# Altium PCB 0.PCB1.PcbDoc (part 8 of 12)
Units mm, origin at the board's own origin, x right, y up, seen from the top; angles counter-clockwise.
Board outline 77 x 72 mm, 6 copper layers (Top Layer, Layer 1, Layer 3, Layer 4, Layer 2, Bottom Layer), stack 1.538 mm thick; 570 components, 490 nets, 3331 pads, 1909 vias.
Unrouted connection lines stored in the file: 2.
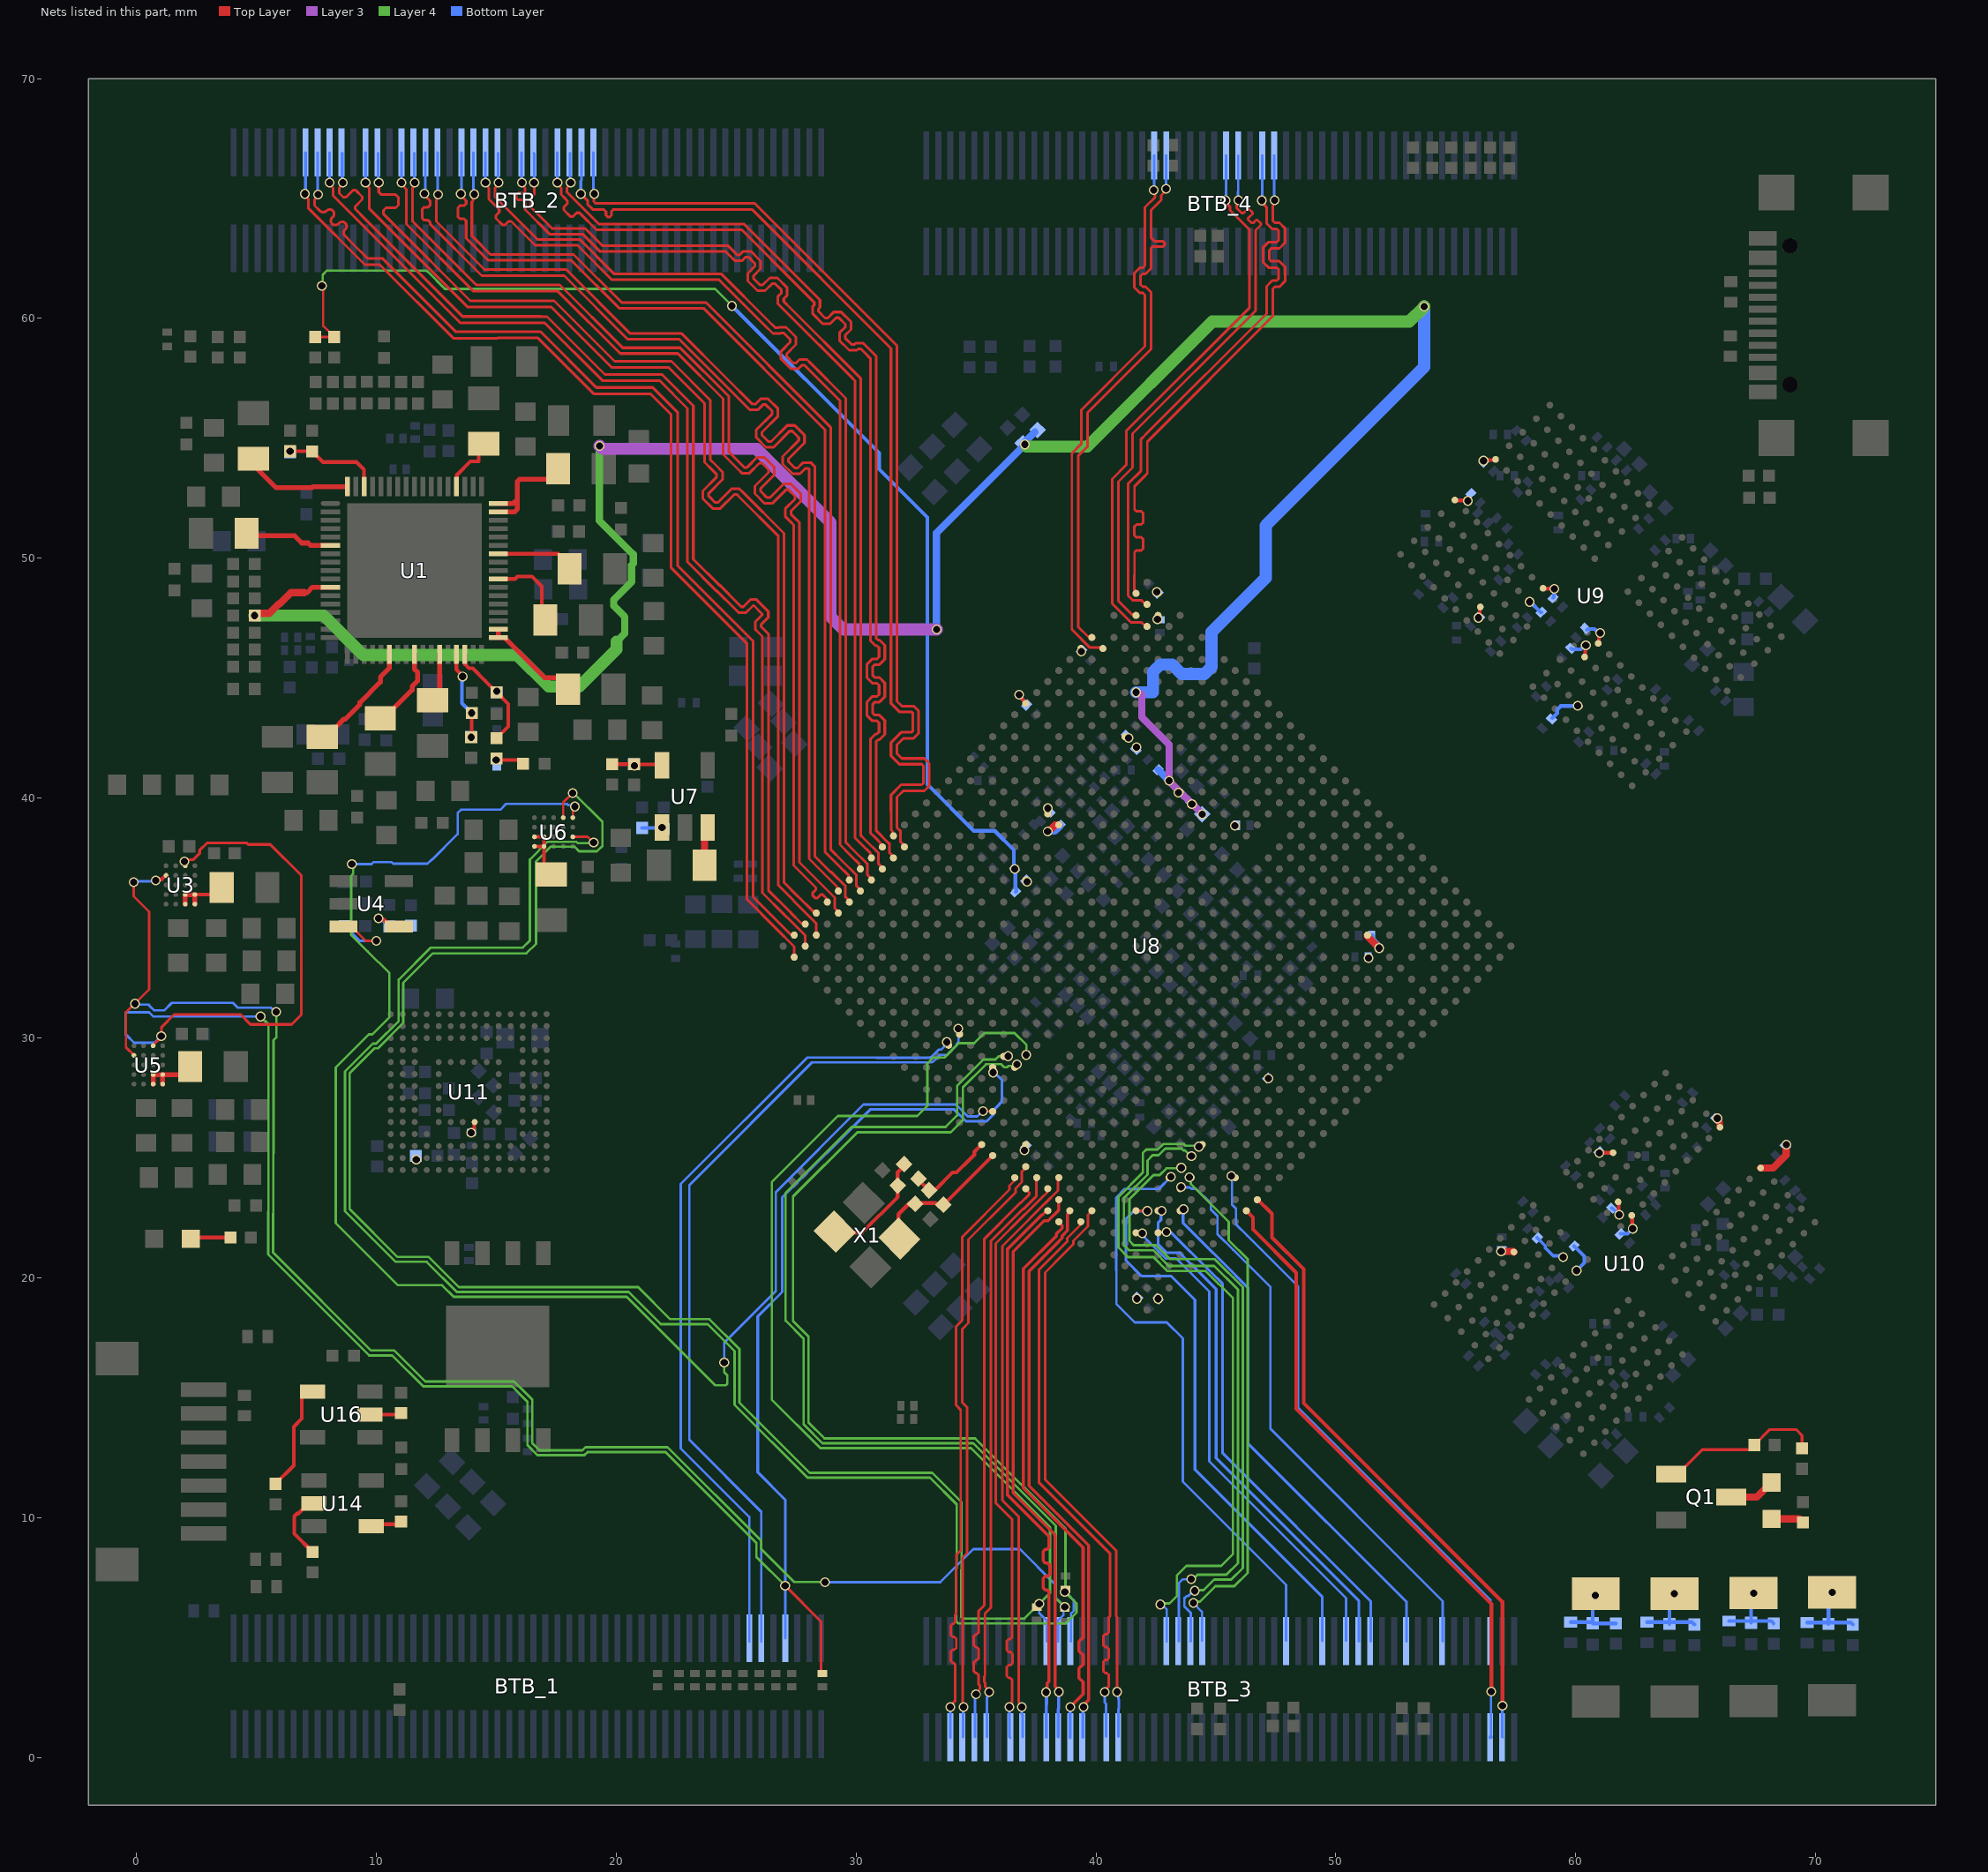
[diagram p12: the nets of this part, all layers, seen from the top]

## Via types
v1: diameter 0.41, hole 0.3, Top Layer to Bottom Layer, tented both sides, 1901 vias
v2: diameter 0.41, hole 0.3, Top Layer to Bottom Layer, 8 vias

## Nets (pads, with @x,y where several pads share a name; then routed paths per layer and width w, separated by ;. In a path a pad name is that pad's centre, name@x,y a point inside that pad or via, vN(x,y) a via of type N, cw(c..) or ccw(c..) an arc to the next point about the centre after c; other vN are vias at no path point) (continued)
HDMI_TX1_D2N: BTB_4.21 U8.AP6 | length 23.4
  Top Layer w0.109: U8.AP6@39.833,46.695 39.796,46.732 39.664,46.732 39.259,47.137 39.259,54.265 39.646,54.652 39.646,56.067 42.307,58.728 42.307,60.844 42.307,61.083 42.073,61.317 41.946,61.317 41.864,61.398 41.864,61.777 41.946,61.858 42.073,61.858 42.307,62.092 42.307,62.947 ; 42.313,62.952 42.364,63.003 42.803,63.003 42.861,63.06 42.861,63.151 42.803,63.208 42.453,63.208 42.307,63.354 42.307,64.523 42.722,64.939 42.722,65.126 42.924,65.327 v1(42.924,65.409)
  Bottom Layer w0.109: v1(42.924,65.409) 42.927,65.413 42.927,65.876 42.931,65.88 BTB_4.21@42.931,66.793
HDMI_TX1_D2P: BTB_4.20 U8.AN6 | length 23.4
  Top Layer w0.109: U8.AN6@40.292,46.235 40.256,46.271 39.755,46.271 38.997,47.029 38.997,54.373 39.385,54.76 39.385,56.175 42.046,58.836 42.046,60.844 42.046,60.975 41.964,61.056 41.837,61.056 41.603,61.29 41.603,61.885 41.837,62.119 41.964,62.119 42.046,62.2 42.046,62.947 42.046,64.632 42.461,65.047 42.461,65.306 v1(42.415,65.352)
  Bottom Layer w0.109: v1(42.415,65.352) 42.431,65.367 BTB_4.20@42.431,66.793
HDMI_TX1_D3N: BTB_4.27 U8.AN3 | length 23.4
  Top Layer w0.109: U8.AN3@41.671,47.614 41.635,47.65 41.51,47.65 40.941,48.218 40.941,53.191 41.528,53.778 41.528,55.193 46.656,60.322 46.656,62.977 46.656,63.677 46.877,63.898 46.877,63.959 46.735,64.101 46.674,64.101 46.552,63.979 46.491,63.979 46.35,64.121 46.35,64.182 46.525,64.357 46.525,64.418 46.383,64.56 46.322,64.56 46.163,64.401 46.073,64.401 46.025,64.449 45.861,64.613 45.861,64.706 45.889,64.734 45.889,64.863 v1(45.946,64.92)
  Bottom Layer w0.109: BTB_4.27@45.931,66.793 45.931,65.299 45.921,65.29 45.921,64.946 v1(45.946,64.92)
HDMI_TX1_D3P: BTB_4.26 U8.AM3 | length 23.3
  Top Layer w0.109: U8.AM3@42.126,47.16 42.074,47.16 41.917,47.317 41.469,47.317 40.677,48.109 40.677,48.631 40.677,53.301 41.263,53.887 41.263,55.303 46.392,60.432 46.392,63.709 45.597,64.504 45.597,64.643 45.395,64.845 v1(45.395,64.916)
  Bottom Layer w0.109: v1@45.431,64.952 45.421,64.962 45.421,65.497 45.431,65.507 BTB_4.26@45.431,66.793
HDMI_TX1_HPD_M0: BTB_3.48 U8.C24 | length 23.9
  Bottom Layer w0.102: v1(45.643,24.246) 45.675,24.214 45.675,23.051 45.839,22.887 45.839,22.225 46.311,21.753 48.419,19.645 48.419,14.577 56.455,6.542 BTB_3.48@56.455,4.843
HDMI_TX1_SBDN: BTB_4.30 U8.AP2 | length 23.4
  Top Layer w0.109: U8.AP2@41.671,48.533 41.634,48.57 41.634,48.666 41.608,48.693 41.608,49.298 41.609,49.299 41.609,49.653 41.609,50.248 41.69,50.329 41.893,50.329 41.974,50.41 41.974,50.789 41.893,50.87 41.688,50.87 41.607,50.951 41.607,51.329 41.688,51.411 41.893,51.411 41.974,51.492 41.974,51.87 41.893,51.951 41.69,51.951 41.609,52.032 41.609,52.446 41.609,53.001 42.071,53.462 42.071,53.466 42.143,53.538 42.143,54.858 47.379,60.094 47.379,60.295 47.379,61.232 47.461,61.313 47.649,61.313 47.885,61.549 47.885,62.146 47.649,62.382 47.309,62.382 47.228,62.463 47.228,62.841 47.309,62.923 47.649,62.923 47.885,63.158 47.885,63.756 47.649,63.992 47.461,63.992 47.379,64.073 47.379,64.334 47.379,64.613 47.377,64.616 47.377,64.706 47.389,64.718 47.389,64.863 v1(47.446,64.92)
  Bottom Layer w0.109: BTB_4.30@47.431,66.793 47.431,65.62 47.431,64.936 v1(47.446,64.92)
HDMI_TX1_SBDP: BTB_4.29 U8.AN2 | length 23.4
  Top Layer w0.109: U8.AN2@42.13,48.074 42.079,48.074 41.915,48.237 41.548,48.237 41.347,48.439 41.347,49.298 41.345,49.299 41.345,53.11 41.881,53.646 41.881,54.966 42.058,55.142 42.058,55.146 47.115,60.204 47.115,60.295 47.115,61.341 47.351,61.577 47.539,61.577 47.62,61.658 47.62,62.037 47.539,62.118 47.199,62.118 46.964,62.354 46.964,62.951 47.199,63.187 47.539,63.187 47.62,63.268 47.62,63.646 47.539,63.728 47.351,63.728 47.115,63.963 47.115,64.334 47.115,64.503 47.112,64.506 47.112,64.639 46.915,64.836 v1(46.915,64.916)
  Bottom Layer w0.109: v1(46.915,64.916) 46.931,64.932 46.931,65.413 BTB_4.29@46.931,66.793
HDMI_TX1_SCL_M0: BTB_1.45 U8.AB30 | length 34.6
  Bottom Layer w0.102: BTB_1.45@26.051,4.843 26.051,10.238 23.05,13.239 23.05,23.864 28.163,28.977 30.73,28.977 33.146,28.977 33.163,28.994 33.202,28.994 33.5,29.293 33.797,29.293 34.194,29.69 34.194,29.746 34.274,29.826 34.274,30.366 v1(34.259,30.381)
HDMI_TX1_SDA_M0: BTB_1.44 U8.AB31 | length 33.8
  Bottom Layer w0.102: BTB_1.44@25.551,4.843 25.551,10.026 22.697,12.881 22.697,23.909 27.968,29.181 30.527,29.181 30.838,29.181 30.848,29.17 33.066,29.17 33.083,29.187 33.122,29.187 33.444,29.509 33.544,29.509 33.786,29.751 v1(33.786,29.823)
HDMI_VDDA0V85_S0: C33.2 C256.2 C257.2 C260.2 C265.2 C266.2 C267.2 C270.2 U1.11 U8.AA9 U8.AB9 U8.AC9 U8.AD9 | length 108.9
  Top Layer w0.203: 6.993,48.563 7.117,48.563 7.343,48.789 U1.11@8.09,48.789
  Top Layer w0.305: v1(4.928,47.609) 5.026,47.707 5.543,47.707 5.935,48.099 5.975,48.099 6.439,48.563 6.993,48.563
  Layer 3 w0.305: v1(37.041,54.746) v1@37.061,54.726 ; v1(41.673,44.41) 41.69,44.41 41.777,44.323 41.909,44.323 41.909,43.372 43.05,42.232 v1(43.05,40.72) 43.05,40.712 44.427,39.335 v1(44.427,39.328)
  Layer 3 w0.508: v1(19.303,54.687) 19.43,54.56 25.864,54.56 28.93,51.494 28.93,47.575 29.471,47.034 v1(33.356,47.034)
  Layer 4 w0.305: v1(19.303,54.687) 19.298,54.682 19.298,51.574 20.711,50.161 20.711,49.781 20.644,49.715 20.644,49.02 19.896,48.271 19.896,48.019 20.23,47.684 ; 20.018,46.522 20.355,46.858 20.355,47.559 20.23,47.684
  Layer 4 w0.508: v1(4.928,47.609) 7.382,47.609 7.384,47.607 7.805,47.607 7.807,47.609 9.456,45.959 15.874,45.959 17.185,44.648 18.468,44.648 20.018,46.199 20.018,46.522 ; v1@37.101,54.654 39.641,54.654 44.851,59.863 53.062,59.863 53.682,60.482 v1(53.682,60.488)
  Bottom Layer w0.305: v1(33.356,47.034) 33.356,51.058 37.041,54.743 v1(37.041,54.746) ; v1(37.041,54.746) 37.04,54.844 C267.2@37.459,55.262 ; C266.2@42.59,41.18 v1(43.05,40.72)
  Bottom Layer w0.508: v1(41.673,44.41) 42.382,44.41 42.382,45.271 42.68,45.568 43.176,45.568 43.576,45.169 44.52,45.169 44.818,45.467 44.818,46.919 47.078,49.18 47.078,51.364 53.682,57.968 v1(53.682,60.488)
  other v1: 44.002,39.753 43.443,40.231
I2C0_SCL_M2: BTB_1.47 R44.2 U3.A3 U5.A3 U8.W30 | length 102.7
  Top Layer w0.114: U5.A3@0.699,29.671 0.699,29.695 1.034,30.029 v1(1.034,30.074) 1.049,30.09 1.049,30.451 1.577,30.978 4.335,30.978 4.754,30.559 6.472,30.559 6.875,30.962 6.875,36.771 5.581,38.065 4.664,38.065 4.605,38.123 2.94,38.123 2.636,37.819 2.636,37.691 2.381,37.436 2.157,37.436 2.075,37.355 v1(2.002,37.355) ; v1(27.045,7.161) 28.544,5.662 R44.2@28.544,3.452
  Top Layer w0.156: v1(2.002,37.355) 2.029,37.329 2.029,37.184 U3.A3@2.037,37.176
  Layer 4 w0.102: v1(5.176,30.889) 5.506,30.559 5.506,22.766 5.496,22.755 5.496,20.968 9.702,16.762 10.666,16.762 11.961,15.468 15.665,15.468 16.301,14.831 16.301,13.02 16.721,12.6 18.675,12.6 18.807,12.732 22.058,12.732 25.848,8.942 25.848,8.358 v1(27.045,7.161)
  Bottom Layer w0.102: v1(1.034,30.074) 1.034,30.073 0.762,29.801 -0.096,29.801 -0.434,30.139 -0.434,31.066 0.535,31.066 0.711,30.889 v1(5.176,30.889)
  Bottom Layer w0.114: v1(27.045,7.161) 27.051,7.155 BTB_1.47@27.051,4.97 ; v1@27.051,7.161 27.051,10.739 25.903,11.886 25.903,18.388 26.921,19.405 26.921,23.348 30.586,27.013 32.694,27.013 34.09,27.013 34.573,26.53 35.458,26.53 35.729,26.802 35.729,26.98 35.986,27.236 35.986,27.248 36.088,27.351 36.088,28.235 35.769,28.555 v1(35.71,28.555)
I2C0_SDA_M2: BTB_3.12 R43.2 U3.B1 U5.B1 U8.W29 | length 107.5
  Top Layer w0.102: v1(-0.112,36.493) -0.112,35.901 0.53,35.258 0.53,32.03 -0.434,31.066 -0.434,29.604 U5.B1@-0.101,29.271
  Top Layer w0.156: v1(0.806,36.56) 0.862,36.616 1.066,36.616 1.226,36.776 U3.B1@1.237,36.776
  Layer 4 w0.102: v1(5.834,31.082) 5.834,30.018 5.721,29.905 5.721,25.183 5.709,25.171 5.709,22.681 5.699,22.671 5.699,21.053 9.787,16.965 10.751,16.965 12.045,15.671 15.749,15.671 16.504,14.916 16.504,13.104 16.805,12.803 18.591,12.803 18.723,12.935 22.142,12.935 26.051,9.026 26.051,8.688 27.426,7.313 28.701,7.313 v1(28.709,7.305) ; v1(36.339,29.237) 35.955,29.237 35.813,29.095 35.314,29.095 34.212,27.993 34.212,26.763 33.733,26.284 33.423,26.284 29.809,26.284 27.063,23.539 27.063,18.21 27.816,17.457 27.816,13.883 28.599,13.099 34.881,13.099 38.327,9.653 38.327,6.648 v1(38.704,6.272)
  Bottom Layer w0.102: v1(-0.112,36.493) -0.079,36.526 0.772,36.526 v1(0.806,36.56) ; v1(-0.06,31.423) -0.06,31.387 0.501,31.387 0.592,31.296 0.736,31.152 1.169,31.152 1.478,31.461 4.025,31.461 4.228,31.258 5.61,31.258 5.785,31.082 v1(5.834,31.082) ; v1(28.709,7.305) 33.515,7.305 34.891,8.682 36.832,8.682 38.28,7.234 38.28,6.696 v1(38.704,6.272) 38.645,6.213 38.645,5.932 38.431,5.718 BTB_3.12@38.431,4.843
I2C1_SCL_M2: BTB_3.13 R41.2 U6.A3 U8.V29 | length 106.9
  Top Layer w0.102: U6.A3@18.193,38.384 18.809,38.384 19.049,38.144 v1(19.061,38.144)
  Layer 4 w0.102: v1(19.061,38.144) 19.041,38.123 18.394,38.123 18.338,38.179 17.144,38.179 16.4,37.435 16.4,34.054 16.111,33.765 12.273,33.765 10.934,32.426 10.934,30.7 9.993,29.76 9.854,29.76 8.698,28.603 8.698,22.77 10.806,20.662 12.1,20.662 13.359,19.403 20.524,19.403 21.86,18.067 23.809,18.067 24.937,16.94 24.937,14.703 27.98,11.66 33.087,11.66 34.198,10.548 34.198,7.902 34.181,7.884 34.181,5.663 34.258,5.586 38.734,5.586 39.186,6.038 39.186,6.425 v1@38.704,6.907 ; v1(36.703,28.892) 36.646,28.835 36.357,28.835 36.299,28.776 36.18,28.776 36.054,28.902 35.414,28.902 34.453,27.941 34.453,26.578 33.944,26.068 33.639,26.068 30.058,26.068 27.375,23.386 27.375,18.185 28.019,17.541 28.019,13.967 28.684,13.302 34.966,13.302 38.729,9.539 38.729,6.922 v1(38.704,6.897)
  Bottom Layer w0.102: v1(38.704,6.897) 38.739,6.897 39.081,6.555 39.081,6.115 38.961,5.995 38.961,4.848 BTB_3.13@38.955,4.843
I2C1_SDA_M2: BTB_3.11 R39.2 U6.B1 U8.V28 | length 110.2
  Top Layer w0.102: U6.B1@17.793,39.184 17.793,39.819 v1(18.181,40.206)
  Layer 4 w0.102: v1(18.181,40.206) 18.226,40.206 19.427,39.005 19.427,38.004 19.201,37.778 18.452,37.778 18.254,37.976 17.276,37.976 16.661,37.361 16.661,33.924 16.263,33.526 12.357,33.526 11.127,32.296 11.127,30.62 10.073,29.567 9.934,29.567 8.891,28.523 8.891,22.864 10.89,20.865 12.184,20.865 13.443,19.607 20.917,19.607 22.253,18.271 23.893,18.271 25.14,17.024 25.14,14.787 28.064,11.863 33.171,11.863 34.402,10.633 34.402,7.818 34.384,7.8 34.384,5.866 34.461,5.789 37.027,5.789 v1(37.637,6.399) 38.091,6.852 38.091,9.599 34.794,12.896 28.515,12.896 26.489,14.922 26.489,23.991 29.242,26.744 32.549,26.744 32.975,27.169 32.975,28.94 33.217,29.182 33.686,29.182 34.282,29.778 34.931,29.778 35.351,30.198 36.607,30.198 37.107,29.698 37.107,29.301 v1(37.097,29.29)
  Bottom Layer w0.102: v1(37.637,6.399) 37.637,6.011 37.955,5.693 BTB_3.11@37.955,4.843
I2C2_SCL_M4: BTB_3.53 U8.A25 | length 26.2
  Top Layer w0.156: U8.A25@46.267,22.795 46.544,22.517 46.544,22.016 48.353,20.207 48.353,14.535 56.484,6.404 v1(56.484,2.741)
  Bottom Layer w0.102: BTB_3.53@56.469,0.857 v1@56.469,2.727
  Bottom Layer w0.156: BTB_3.53@56.455,0.843 BTB_3.53@56.469,0.857 ; v1@56.469,2.727 v1(56.484,2.741)
I2C2_SDA_M4: BTB_3.52 U8.A24 | length 26.7
  Top Layer w0.156: U8.A24@46.727,23.255 46.755,23.255 47.284,22.726 47.342,22.667 47.342,21.679 48.661,20.361 48.661,14.768 56.946,6.482 v1(56.946,2.157)
  Bottom Layer w0.102: v1(56.946,2.157) 56.939,2.149 56.939,0.859 BTB_3.52@56.955,0.843
I2C5_SCL_M3: BTB_3.24 U8.E26 | length 22
  Layer 4 w0.102: v1(43.905,24.19) 43.953,24.142 43.953,23.908 45.536,22.324 45.536,21.562 46.324,20.775 46.324,7.694 45.765,7.135 44.978,7.135 44.34,6.498 44.117,6.498 v1(44.058,6.439)
  Bottom Layer w0.102: v1(44.058,6.439) 44.419,6.078 BTB_3.24@44.419,4.878
I2C5_SDA_M3: BTB_3.44 U8.E27 | length 23.8
  Bottom Layer w0.102: v1(43.543,23.781) 43.559,23.765 43.921,23.765 43.971,23.714 44.177,23.714 44.79,23.1 44.79,22.843 45.067,22.567 45.067,21.822 45.723,21.165 47.276,19.612 47.276,13.693 54.455,6.515 BTB_3.44@54.455,4.843
I2C7_SCL_M0: BTB_3.23 U8.F26 | length 26.5
  Layer 4 w0.102: v1(43.559,24.583) 43.538,24.562 42.938,24.562 42.656,24.28 42.399,24.28 41.396,23.277 41.396,21.537 41.574,21.359 42.501,21.359 43.085,20.775 44.952,20.775 46.121,19.607 46.121,7.897 45.638,7.415 44.927,7.415 44.485,6.972 44.15,6.972 v1(44.124,6.946)
  Bottom Layer w0.102: BTB_3.23@43.955,4.843 43.955,6.024 43.686,6.293 43.686,6.631 43.776,6.721 43.834,6.721 44.06,6.946 v1(44.124,6.946)
I2C7_SDA_M0: BTB_3.31 U8.F27 | length 24.8
  Bottom Layer w0.102: v1(43.133,24.211) 42.623,23.701 41.204,23.701 40.842,23.339 40.842,20.298 40.853,20.287 40.853,18.909 41.62,18.141 42.699,18.141 42.95,18.141 43.619,17.472 43.619,11.499 47.931,7.187 BTB_3.31@47.931,4.867
I2C8_SCL_M2: BTB_3.21 U8.F24 | length 29.3
  Layer 4 w0.102: v1(42.687,6.373) 42.738,6.425 43.073,6.425 43.377,6.729 43.377,7.592 43.771,7.986 45.219,7.986 45.714,8.481 45.714,19.149 44.586,20.277 42.986,20.277 42.4,20.863 41.333,20.863 40.939,21.258 40.939,23.366 41.955,24.382 41.955,25.195 42.107,25.347 42.577,25.347 42.804,25.574 43.655,25.574 43.723,25.506 44.259,25.506 v1(44.296,25.468)
  Bottom Layer w0.102: v1(42.687,6.373) 42.742,6.373 42.955,6.161 BTB_3.21@42.955,4.843
I2C8_SDA_M2: BTB_3.22 U8.F25 | length 28.3
  Layer 4 w0.102: v1(43.975,7.436) 44.059,7.436 44.241,7.618 45.435,7.618 45.917,8.1 45.917,19.505 44.927,20.496 43.041,20.496 42.391,21.146 41.381,21.146 41.168,21.359 41.168,23.321 42.148,24.302 42.148,24.889 42.363,25.104 42.607,25.104 42.884,25.381 43.575,25.381 43.643,25.313 43.715,25.313 43.952,25.076 v1(43.984,25.076)
  Bottom Layer w0.102: BTB_3.22@43.455,4.843 43.455,7.264 43.618,7.427 43.966,7.427 v1(43.975,7.436)
I2S0_LRCK: BTB_3.38 U8.D30 | length 20.7
  Bottom Layer w0.114: v1(42.942,21.902) 42.979,21.865 43.159,21.865 44.791,20.233 45.282,19.741 45.282,12.683 51.455,6.511 BTB_3.38@51.455,4.843
I2S0_MCLK: BTB_3.34 U8.F30 | length 23.2
  Top Layer w0.114: U8.F30@41.671,22.794 41.677,22.788 42.137,22.788 v1(42.144,22.781)
  Bottom Layer w0.114: v1(42.144,22.781) 41.584,22.781 41.251,22.449 41.251,20.717 41.907,20.061 43.142,20.061 43.881,19.323 44.129,19.074 44.129,12.004 49.431,6.703 BTB_3.34@49.431,4.867
I2S0_SCLK: BTB_3.36 U8.E31 | length 20.8
  Bottom Layer w0.102: v1(41.936,21.848) 41.936,21.773 42.909,20.8 43.352,20.8 44.724,19.429 44.724,12.342 50.431,6.635 BTB_3.36@50.431,4.867
I2S0_SDI0: BTB_3.41 U8.D28 | length 21.9
  Bottom Layer w0.114: v1(43.651,22.855) 43.633,22.837 43.633,22.286 44.567,21.352 44.57,21.352 45.24,20.682 46.342,19.581 46.342,13.089 52.955,6.475 BTB_3.41@52.955,4.843
I2S0_SDO0: BTB_3.37 U8.E29 | length 21.8
  Bottom Layer w0.114: v1(42.735,22.789) 42.714,22.767 42.714,22.41 42.588,22.284 42.588,21.403 42.947,21.044 43.49,21.044 44.546,19.988 45.011,19.523 45.011,12.479 50.955,6.535 BTB_3.37@50.955,4.843
MIPI_DPHY0_RX_CLKN: BTB_2.13 U8.AP31 | length 45.7
  Top Layer w0.112: v1(10.103,65.658) 10.103,65.636 10.103,65.266 10.212,65.158 10.813,65.158 10.922,65.049 10.922,64.722 10.813,64.614 10.41,64.614 10.301,64.505 10.301,64.351 10.638,64.013 13.922,60.73 17.411,60.73 19.931,58.21 22.306,58.21 23.929,56.587 23.929,54.104 24.162,53.871 24.433,53.6 24.433,53.283 23.855,52.706 23.855,52.59 24.125,52.321 24.24,52.321 24.817,52.898 25.134,52.898 25.296,52.737 26.994,51.039 26.994,36.482 27.576,35.899 27.588,35.899 28.2,35.288 28.207,35.288 28.29,35.204 U8.AP31@28.342,35.204
  Bottom Layer w0.112: v1@10.077,65.685 BTB_2.13@10.077,66.895
MIPI_DPHY0_RX_CLKP: BTB_2.12 U8.AN32 | length 45.7
  Top Layer w0.112: v1(9.552,65.658) 9.552,65.588 9.715,65.426 9.715,64.567 13.813,60.469 17.303,60.469 19.823,57.948 22.198,57.948 22.432,57.715 23.685,56.461 23.685,54.003 23.99,53.698 24.189,53.499 24.189,53.384 23.612,52.806 23.612,52.489 24.024,52.077 24.341,52.077 24.918,52.655 25.034,52.655 25.124,52.564 26.75,50.938 26.75,36.381 27.404,35.727 27.404,35.714 28.342,34.776 U8.AN32@28.342,34.285
  Bottom Layer w0.112: v1@9.551,65.659 BTB_2.12@9.551,66.92
MIPI_DPHY0_RX_D0N: BTB_2.17 U8.AP29 | length 45.8
  Top Layer w0.112: v1(12.01,65.2) 12.01,65.142 12.241,64.911 12.241,64.829 12.241,64.718 12.159,64.637 12,64.637 11.919,64.555 11.919,64.174 12,64.093 12.159,64.093 12.241,64.011 12.241,63.955 12.241,63.937 14.4,61.778 17.84,61.778 20.489,59.128 22.637,59.128 24.4,57.366 25.584,56.182 25.897,56.182 26.121,56.405 26.236,56.405 26.505,56.136 26.505,56.02 25.836,55.351 25.836,55.037 26.245,54.628 26.559,54.628 27.229,55.297 27.344,55.297 27.613,55.028 27.613,54.913 26.944,54.243 26.944,53.929 27.353,53.52 27.667,53.52 27.898,53.752 28.014,53.752 28.048,53.718 28.048,53.607 28.048,37.468 29.225,36.291 29.225,36.159 U8.AP29@29.261,36.123
  Bottom Layer w0.112: v1(12.01,65.2) 12.047,65.237 12.047,66.916 BTB_2.17@12.051,66.92
MIPI_DPHY0_RX_D0P: BTB_2.18 U8.AN29 | length 45.8
  Top Layer w0.112: v1(12.578,65.167) 12.521,65.11 12.521,64.971 12.502,64.953 12.502,64.045 14.508,62.039 17.917,62.039 20.589,59.368 22.736,59.368 24.569,57.535 25.683,56.421 25.798,56.421 26.022,56.644 26.335,56.644 26.745,56.235 26.745,55.921 26.075,55.252 26.075,55.136 26.344,54.867 26.46,54.867 27.129,55.537 27.443,55.537 27.853,55.127 27.853,54.814 27.183,54.144 27.183,54.029 27.452,53.759 27.568,53.759 27.799,53.991 28.113,53.991 28.272,53.832 28.287,53.817 28.287,37.567 28.946,36.908 28.975,36.908 29.559,36.325 29.559,35.877 29.721,35.715 U8.AN29@29.721,35.664
  Bottom Layer w0.112: v1@12.555,65.19 12.551,65.194 12.551,66.912 BTB_2.18@12.555,66.916
MIPI_DPHY0_RX_D1N: BTB_2.15 U8.AP30 | length 45.8
  Top Layer w0.112: v1(11.052,65.658) 11.052,65.588 11.255,65.385 11.255,63.933 14.057,61.131 17.575,61.131 20.172,58.534 22.57,58.534 24.456,56.647 24.456,54.334 25.082,53.709 25.241,53.549 25.555,53.549 25.967,53.961 26.082,53.961 26.351,53.692 26.351,53.576 25.782,53.007 25.782,52.693 26.191,52.284 26.505,52.284 27.074,52.853 27.19,52.853 27.459,52.584 27.459,52.469 27.047,52.057 27.047,51.743 27.283,51.508 27.398,51.393 27.398,37.189 28.318,36.269 28.318,36.176 28.185,36.042 28.185,35.949 28.298,35.837 28.391,35.837 28.524,35.97 28.617,35.97 28.765,35.822 28.765,35.7 U8.AP30@28.801,35.664
  Bottom Layer w0.112: v1@11.051,65.659 BTB_2.15@11.051,66.92
MIPI_DPHY0_RX_D1P: BTB_2.16 U8.AN30 | length 45.8
  Top Layer w0.112: v1(11.603,65.658) 11.546,65.601 11.546,65.473 11.517,65.443 11.517,64.041 14.165,61.392 17.652,61.392 20.271,58.773 22.669,58.773 24.696,56.746 24.696,54.433 25.251,53.878 25.34,53.789 25.456,53.789 25.867,54.2 26.181,54.2 26.591,53.791 26.591,53.477 26.021,52.908 26.021,52.792 26.29,52.523 26.405,52.523 26.975,53.093 27.289,53.093 27.698,52.683 27.698,52.369 27.287,51.958 27.287,51.842 27.452,51.677 27.637,51.492 27.637,37.32 29.11,35.846 29.11,35.407 29.174,35.343 ; 29.174,35.342 29.261,35.255 U8.AN30@29.261,35.204
  Bottom Layer w0.112: v1@11.577,65.685 BTB_2.16@11.577,66.895
MIPI_DPHY0_RX_D2N: BTB_2.10 U8.AP32 | length 45.8
  Top Layer w0.112: v1(8.603,65.658) 8.603,65.588 8.458,65.444 8.458,65.439 8.458,65.222 8.624,65.056 8.739,65.056 9.028,65.344 9.143,65.344 9.412,65.075 9.412,64.959 9.124,64.671 9.124,64.556 9.549,64.131 13.601,60.079 16.857,60.079 16.864,60.072 17.117,60.072 19.529,57.66 21.911,57.66 23.218,56.353 23.218,49.955 24.299,48.874 24.318,48.874 25.121,48.071 25.213,47.979 25.306,47.979 25.602,48.275 25.849,48.275 26.343,47.781 26.343,47.533 26.047,47.237 26.047,47.144 26.093,47.098 26.185,47.006 26.347,46.844 26.347,36.156 27.204,35.299 27.21,35.299 27.278,35.231 27.278,35.216 27.713,34.781 27.846,34.781 U8.AP32@27.882,34.745
  Bottom Layer w0.112: v1@8.577,65.685 BTB_2.10@8.577,66.895
MIPI_DPHY0_RX_D2P: BTB_2.9 U8.AN33 | length 45.8
  Top Layer w0.112: v1(8.052,65.658) 8.052,65.588 8.197,65.444 8.197,65.222 8.199,65.22 8.199,65.114 13.493,59.819 17.013,59.819 19.425,57.407 21.807,57.407 22.965,56.249 22.965,49.85 24.194,48.621 24.213,48.621 24.942,47.892 25.034,47.8 25.108,47.726 25.41,47.726 25.706,48.022 25.745,48.022 26.091,47.676 26.091,47.638 25.795,47.341 25.795,47.039 25.914,46.92 26.006,46.828 26.094,46.74 26.094,36.051 27.025,35.12 27.025,35.114 27.093,35.047 27.108,35.047 27.739,34.416 27.746,34.416 27.882,34.28 U8.AN33@27.882,33.825
  Bottom Layer w0.112: v1@8.051,65.659 BTB_2.9@8.051,66.92
MIPI_DPHY0_RX_D3N: BTB_2.8 U8.AP33 | length 45.8
  Top Layer w0.112: v1(7.577,65.167) 7.577,65.103 7.427,64.953 7.427,64.936 7.427,64.709 7.658,64.478 ccw(c7.788,64.607) 7.917,64.478 7.932,64.492 cw(c8.061,64.363) 8.191,64.492 cw(c8.061,64.363) 8.191,64.233 8.161,64.203 ccw(c8.29,64.074) 8.161,63.944 ccw(c8.29,64.074) 8.42,63.944 8.45,63.974 cw(c8.579,63.845) 8.709,63.974 cw(c8.579,63.845) 8.709,63.715 8.694,63.701 ccw(c8.824,63.571) 8.694,63.442 8.993,63.143 9.632,62.504 10.253,62.504 13.32,59.438 14.951,59.438 14.956,59.443 16.848,59.443 19.172,57.12 21.53,57.12 22.556,56.093 22.556,49.701 25.713,46.544 25.713,35.877 27.269,34.322 27.386,34.322 U8.AP33@27.423,34.285
  Bottom Layer w0.112: v1@7.555,65.19 BTB_2.8@7.555,66.916
MIPI_DPHY0_RX_D3P: BTB_2.7 U8.AN34 | length 45.8
  Top Layer w0.112: v1(7.027,65.195) 7.027,65.119 7.166,64.98 7.166,64.601 9.524,62.243 10.145,62.243 13.211,59.176 15.059,59.176 15.064,59.182 16.74,59.182 19.064,56.858 21.427,56.858 21.662,56.622 21.662,56.617 22.295,55.985 22.295,49.601 25.457,46.438 25.457,35.772 26.638,34.591 27.423,33.806 U8.AN34@27.423,33.366
  Bottom Layer w0.112: v1@7.051,65.219 BTB_2.7@7.051,66.92
MIPI_DPHY0_TX_CLKN: BTB_2.25 U8.AP26 | length 41.6
  Top Layer w0.112: v1@16.075,65.603 16.075,65.571 16.203,65.443 16.203,65.281 16.137,65.215 15.904,65.215 15.839,65.149 15.839,65.011 15.904,64.946 16.095,64.946 16.203,64.838 16.203,64.541 17.24,63.503 18.62,63.503 19.337,62.786 24.569,62.786 24.782,62.573 24.941,62.414 25.255,62.414 25.399,62.558 25.515,62.558 25.784,62.289 25.784,62.174 25.486,61.875 25.486,61.562 25.895,61.152 26.209,61.152 26.507,61.451 26.623,61.451 26.892,61.181 26.892,61.066 26.747,60.921 26.747,60.607 27.101,60.254 29.781,57.574 29.953,57.402 29.953,38.349 30.244,38.058 30.607,37.695 30.607,37.535 U8.AP26@30.64,37.502
  Bottom Layer w0.112: BTB_2.25@16.051,66.92 16.051,65.984 16.059,65.976 16.059,65.666 v1(16.067,65.658)
MIPI_DPHY0_TX_CLKP: BTB_2.26 U8.AN26 | length 41.6
  Top Layer w0.112: v1@16.552,65.603 16.579,65.577 16.579,65.17 16.449,65.041 16.449,64.633 17.339,63.743 18.719,63.743 19.436,63.025 24.668,63.025 24.951,62.742 25.04,62.653 25.156,62.653 25.3,62.798 25.614,62.798 26.023,62.388 26.023,62.074 25.725,61.776 25.725,61.661 25.994,61.392 26.11,61.392 26.408,61.69 26.722,61.69 27.131,61.28 27.131,60.967 26.987,60.822 26.987,60.707 27.27,60.423 30.02,57.673 30.192,57.501 30.192,38.448 30.343,38.297 30.937,37.703 30.937,37.256 31.099,37.093 U8.AN26@31.099,37.043
  Bottom Layer w0.112: BTB_2.26@16.567,66.885 16.579,66.873 v1(16.579,65.658)
MIPI_DPHY0_TX_D0N: BTB_2.30 U8.AP24 | length 41.7
  Top Layer w0.112: v1@18.564,65.202 18.564,65.158 18.805,64.916 18.805,64.762 19.024,64.544 19.476,64.544 19.575,64.444 19.575,64.298 19.641,64.232 19.738,64.232 19.804,64.298 19.804,64.46 19.887,64.544 25.659,64.544 31.458,58.745 31.458,43.945 31.806,43.597 32.308,43.597 32.374,43.531 32.374,42.804 32.308,42.738 31.884,42.738 31.458,42.312 31.458,41.76 31.806,41.413 32.743,41.413 32.808,41.347 32.808,41.014 32.802,41.008 32.802,40.614 32.743,40.554 31.884,40.554 31.458,40.127 31.458,39.411 31.469,39.4 31.469,38.669 31.523,38.614 31.523,38.456 U8.AP24@31.554,38.425 ; U8.AP24@31.525,38.456 U8.AP24@31.559,38.422
  Bottom Layer w0.112: v1@18.551,65.219 18.527,65.243 18.527,65.738 18.547,65.758 18.547,66.916 BTB_2.30@18.551,66.92
  other v1: 18.527,65.195
MIPI_DPHY0_TX_D0P: BTB_2.31 U8.AN24 | length 41.7
  Top Layer w0.112: v1(19.086,65.19) 19.067,65.171 19.067,64.871 19.132,64.805 25.767,64.805 31.708,58.864 31.708,44.033 31.905,43.836 32.407,43.836 32.613,43.63 32.613,42.705 32.395,42.487 31.971,42.487 31.708,42.224 31.708,41.849 31.905,41.652 32.842,41.652 33.048,41.446 33.048,41.014 33.054,41.008 33.054,40.509 32.847,40.303 31.971,40.303 31.708,40.039 31.708,38.768 31.857,38.619 31.857,38.175 32.019,38.013 U8.AN24@32.019,37.962
  Bottom Layer w0.112: BTB_2.31@19.055,66.916 19.051,66.912 19.051,65.549 19.049,65.547 19.055,65.541 19.055,65.222 v1(19.086,65.19)
MIPI_DPHY0_TX_D1N: BTB_2.28 U8.AP25 | length 41.7
  Top Layer w0.112: v1(17.552,65.658) 17.552,65.599 17.708,65.443 17.708,65.162 17.846,65.025 17.968,64.903 17.968,64.787 17.818,64.638 17.818,64.522 18.087,64.253 18.203,64.253 18.352,64.403 18.468,64.403 18.507,64.363 19.177,63.694 25.236,63.694 27.613,61.317 28.256,60.674 28.256,60.558 28.2,60.502 28.2,60.189 28.61,59.779 28.923,59.779 29.168,60.024 29.283,60.024 29.552,59.754 29.552,59.639 29.308,59.394 29.308,59.081 29.717,58.671 30.031,58.671 30.087,58.727 30.202,58.727 30.349,58.581 30.595,58.335 30.595,46.797 30.595,46.572 30.817,46.35 30.878,46.35 30.959,46.269 30.959,45.888 30.878,45.806 30.68,45.806 30.458,45.584 30.458,45.005 30.68,44.784 30.878,44.784 30.959,44.702 30.959,44.321 30.878,44.239 30.68,44.239 30.458,44.018 30.458,43.439 30.68,43.217 30.878,43.217 30.959,43.135 30.959,42.754 30.878,42.673 30.817,42.673 30.595,42.451 30.595,41.91 30.595,38.549 30.826,38.318 31.028,38.116 31.028,38.084 31.099,38.013 U8.AP25@31.099,37.962
  Bottom Layer w0.112: v1@17.551,65.659 BTB_2.28@17.551,66.92
MIPI_DPHY0_TX_D1P: BTB_2.29 U8.AN25 | length 41.6
  Top Layer w0.112: v1(18.103,65.658) 18.103,65.599 17.947,65.443 17.947,65.262 19.276,63.933 25.335,63.933 27.782,61.486 28.495,60.773 28.495,60.459 28.439,60.403 28.439,60.288 28.709,60.018 28.824,60.018 29.069,60.263 29.382,60.263 29.792,59.854 29.792,59.54 29.547,59.295 29.547,59.18 29.816,58.911 29.932,58.911 29.988,58.967 30.301,58.967 30.518,58.75 30.834,58.434 30.834,46.797 30.834,46.671 30.916,46.589 30.977,46.589 31.199,46.368 31.199,45.789 30.977,45.567 30.779,45.567 30.698,45.485 30.698,45.104 30.779,45.023 30.977,45.023 31.199,44.801 31.199,44.222 30.977,44 30.779,44 30.698,43.919 30.698,43.538 30.779,43.456 30.977,43.456 31.199,43.234 31.199,42.655 30.977,42.434 30.916,42.434 30.834,42.352 30.834,41.91 30.834,38.648 30.925,38.557 31.267,38.215 31.397,38.085 31.397,37.715 31.559,37.553 U8.AN25@31.559,37.502
  Bottom Layer w0.112: v1@18.077,65.685 BTB_2.29@18.077,66.895
MIPI_DPHY0_TX_D2N: BTB_2.22 U8.AP27 | length 41.7
  Top Layer w0.112: v1(14.552,65.658) 14.552,65.586 14.694,65.444 14.694,64.974 15.024,64.644 15.125,64.543 15.125,64.428 14.985,64.288 14.985,64.172 15.254,63.903 15.37,63.903 15.51,64.043 15.625,64.043 15.665,64.004 16.622,63.047 18.387,63.047 19.823,61.611 24.292,61.611 26.146,59.756 26.534,59.368 26.848,59.368 26.872,59.392 26.987,59.392 27.256,59.123 27.256,59.008 26.873,58.624 26.873,58.311 27.283,57.901 27.596,57.901 27.741,58.046 27.856,58.046 27.946,57.957 29.331,56.572 29.331,38.052 29.785,37.598 30.147,37.236 30.147,37.076 U8.AP27@30.18,37.043
  Bottom Layer w0.112: v1@14.552,65.66 BTB_2.22@14.552,65.976 ; BTB_2.22@14.551,65.977 BTB_2.22@14.551,66.92
MIPI_DPHY0_TX_D2P: BTB_2.23 U8.AN27 | length 41.7
  Top Layer w0.112: v1(15.098,65.658) 15.098,65.586 14.956,65.444 14.956,65.051 16.721,63.286 18.486,63.286 19.923,61.85 24.391,61.85 26.315,59.926 26.633,59.608 26.749,59.608 26.773,59.632 27.086,59.632 27.496,59.222 27.496,58.909 27.112,58.525 27.112,58.41 27.382,58.141 27.497,58.141 27.642,58.285 27.955,58.285 28.115,58.126 29.57,56.671 29.57,38.151 29.884,37.838 30.478,37.243 30.478,36.796 30.64,36.634 U8.AN27@30.64,36.583
  Bottom Layer w0.112: BTB_2.23@15.077,66.894 15.077,65.679 v1(15.098,65.658)
MIPI_DPHY0_TX_D3N: BTB_2.20 U8.AP28 | length 41.6
  Top Layer w0.112: v1(13.527,65.195) 13.527,65.126 13.746,64.907 13.746,64.779 13.664,64.698 13.484,64.698 13.403,64.616 13.403,64.235 13.484,64.154 13.664,64.154 13.746,64.072 13.746,64.016 13.746,63.344 14.662,62.428 18.125,62.428 20.126,60.427 23.639,60.427 28.703,55.363 28.703,37.761 29.255,37.209 29.688,36.776 29.688,36.616 U8.AP28@29.721,36.583
  Bottom Layer w0.112: v1@13.551,65.219 BTB_2.20@13.551,66.92
MIPI_DPHY0_TX_D3P: BTB_2.21 U8.AN28 | length 41.6
  Top Layer w0.112: v1(14.086,65.176) 14.029,65.119 14.029,64.892 13.985,64.848 13.985,63.443 14.761,62.667 18.224,62.667 20.225,60.666 23.738,60.666 28.943,55.462 28.943,37.86 29.424,37.378 30.018,36.784 30.018,36.336 30.18,36.174 U8.AN28@30.18,36.124
  Bottom Layer w0.112: BTB_2.21@14.055,66.916 14.055,65.207 v1(14.086,65.176)
NetC25_1: C25.1 R3.1 R5.2 U1.31 | length 3.8
  Top Layer w0.156: U1.31@13.34,45.988 13.34,45.354 13.597,45.097 v1(13.597,45.069) ; v1(13.955,42.536) 13.978,42.558 v1(13.978,43.545)
  Bottom Layer w0.156: v1(13.597,45.069) 13.622,45.044 13.622,44.917 13.573,44.868 13.573,43.95 v1(13.978,43.545)
NetC42_1: C42.1 R7.1 R9.2 U1.66 | length 4.1
  Top Layer w0.156: R7.1@6.409,54.46 6.41,54.459 R9.2@7.323,54.459 7.773,54.01 9.177,54.01 9.49,53.697 U1.66@9.49,52.989
  other v1: 6.409,54.46
NetC63_2: C63.2 R11.2 R12.2 U1.32 | length 4.6
  Top Layer w0.156: U1.32@13.69,45.988 13.712,45.967 13.712,45.562 13.866,45.409 14.019,45.409 14.562,44.866 14.969,44.459 v1(15.019,44.459) C63.2@15.019,44.409 15.502,43.926 15.502,42.986 R12.2@15.019,42.504
NetC70_1: C70.1 R12.1 U2.1 | length 1.2
  Top Layer w0.156: v1(14.994,41.589) 15.966,41.589 C70.1@16.119,41.437
NetC80_2: C80.2 R21.2 U4.4 | length 2.5
  Top Layer w0.156: v1(10.09,34.985) 10.139,34.936 10.306,34.936 10.598,34.643 U4.4@10.941,34.643
  Bottom Layer w0.156: v1(10.09,34.985) 10.139,34.936 10.253,34.936 C80.2@10.538,34.651 11.428,34.651 R21.2@11.453,34.676
NetC92_1: C92.1 R25.1 R28.2 U7.5 | length 2.1
  Top Layer w0.156: R28.2@19.84,41.414 20.748,41.414 R25.1@20.754,41.407 21.873,41.407 U7.5@21.913,41.368 ; v1(20.758,41.349) R25.1@20.758,41.407
NetC102_2: C102.2 R26.1 U7.1 | length 0.8
  Bottom Layer w0.156: R26.1@21.085,38.754 21.899,38.754 v1(21.913,38.768)
NetC172_2: C172.2 R29.2 X1.1 | length 4.8
  Top Layer w0.156: X1.1@29.118,21.919 29.153,21.884 30.256,21.884 31.737,23.365 C172.2@31.737,23.841 31.737,24.4 R29.2@32.125,24.788
NetC174_2: C174.2 R30.1 U8.R34 X1.3 | length 6
  Top Layer w0.156: X1.3@31.805,21.636 31.77,21.672 31.77,22.653 32.229,23.112 33.114,23.112 33.116,23.114 33.328,23.114 33.398,23.044 33.423,23.044 33.576,23.197 33.818,23.197 33.818,23.212 U8.R34@35.696,25.089
NetC242_1: C242.1 U8.AF20
  other v1: 37.133,36.516
NetC244_2: C244.2 C245.2 R65.1 R67.1 U8.AG20 | length 51.1
  Top Layer w0.102: R67.1@7.462,59.224 8.09,59.224 R65.1@8.173,59.307 ; v1(7.732,61.355) 7.79,61.297 7.79,59.683 8.122,59.351 R65.1@8.122,59.307
  Layer 4 w0.102: v1(7.732,61.355) 7.767,61.39 7.767,61.821 7.94,61.995 12.086,61.995 12.137,61.943 12.152,61.943 12.863,61.233 24.121,61.233 v1(24.83,60.523)
  Bottom Layer w0.156: v1(24.83,60.523) 30.968,54.386 30.968,53.705 32.971,51.702 32.971,40.925 32.971,40.569 34.904,38.636 35.778,38.636 36.577,37.837 36.577,37.073 v1(36.613,37.037) 36.648,37.002 36.648,36.258 36.685,36.22 36.685,36.119 C245.2@36.65,36.083
NetC393_2: C393.2 U11.C2
  other v1: 11.666,24.927
NetC400_2: C400.2 R133.1 SW1.2 U17.2 | length 3.1
  Bottom Layer w0.156: U17.2@59.795,5.638 60.665,5.638 C400.2@60.709,5.594 ; v1(60.824,6.749) 60.709,6.634 C400.2@60.709,5.594 ; R133.1@61.675,5.587 60.716,5.587 C400.2@60.709,5.594
NetC401_2: C401.2 R136.1 SW2.2 U20.2 | length 3.4
  Bottom Layer w0.156: U20.2@62.97,5.638 C401.2@63.91,5.638 ; C401.2@63.91,5.561 C401.2@63.91,5.638 ; v1(64.115,6.824) 64.115,6.745 63.91,6.539 C401.2@63.91,5.638 ; R136.1@64.951,5.536 64.849,5.638 C401.2@63.91,5.638
NetC402_2: C402.2 R138.1 SW3.2 U21.2 | length 3.2
  Bottom Layer w0.156: U21.2@66.399,5.689 C402.2@67.313,5.689 ; C402.2@67.313,5.612 C402.2@67.313,5.689 ; v1(67.417,6.849) 67.417,6.77 67.313,6.666 C402.2@67.313,5.689 ; R138.1@68.253,5.587 68.151,5.689 C402.2@67.313,5.689
NetC403_2: C403.2 R142.1 SW4.2 U22.2 | length 3.3
  Bottom Layer w0.156: U22.2@69.65,5.619 C403.2@70.539,5.619 ; C403.2@70.539,5.561 C403.2@70.539,5.619 ; v1(70.692,6.879) 70.692,6.8 70.539,6.647 C403.2@70.539,5.619 ; R142.1@71.555,5.536 71.472,5.619 C403.2@70.539,5.619
NetL1_1: L1.1 U1.45 | length 3.3
  Top Layer w0.156: U1.45@15.091,50.189 17.583,50.189 18.057,49.715 L1.1@18.057,49.565
NetL2_1: L2.1 U1.50 U1.51 | length 4.8
  Top Layer w0.203: U1.50@15.091,51.939 15.768,51.939 15.883,52.054 15.883,52.46 ; U1.51@15.091,52.289 15.711,52.289 15.883,52.46 ; L2.1@17.585,53.73 17.585,53.71 17.163,53.289 15.975,53.289 15.883,53.197 15.883,52.46
NetL3_1: L3.1 U1.29 | length 2
  Top Layer w0.203: L3.1@12.352,44.078 12.64,44.366 12.64,44.866 U1.29@12.64,45.988
NetL4_1: L4.1 U1.35 U1.36 | length 4.2
  Top Layer w0.203: U1.36@15.091,47.039 U1.35@15.091,46.689 15.387,46.689 15.389,46.687 15.389,46.649 16.112,45.926 17.014,45.023 17.593,45.023 17.991,44.625 L4.1@17.991,44.536
NetL5_1: L5.1 U1.68 | length 4.7
  Top Layer w0.203: L5.1@4.628,54.127 5.81,52.945 6.993,52.945 7.318,52.945 7.362,52.989 U1.68@8.79,52.989
NetL6_1: L6.1 U1.55 | length 2.5
  Top Layer w0.156: U1.55@13.34,52.989 13.362,53.01 13.362,53.476 13.921,54.035 14.267,54.035 14.267,54.553 L6.1@14.486,54.772
NetL7_1: L7.1 U1.6 | length 3.7
  Top Layer w0.203: L7.1@4.59,51.038 4.692,50.936 6.593,50.936 6.894,50.635 7.158,50.635 7.255,50.539 U1.6@8.09,50.539
NetL8_1: L8.1 U1.23 | length 4.4
  Top Layer w0.203: L8.1@7.757,42.553 8.157,42.953 8.307,42.953 8.65,43.296 8.713,43.296 9.316,43.899 9.316,43.986 10.17,44.839 10.17,44.866 10.17,45.043 10.54,45.413 U1.23@10.54,45.69
NetL9_1: L9.1 U1.26 | length 3.5
  Top Layer w0.203: L9.1@10.168,43.327 10.318,43.327 11.499,44.508 11.499,44.663 11.702,44.866 11.725,44.888 11.725,45.243 11.592,45.376 11.592,45.987 U1.26@11.59,45.988
NetL10_1: L10.1 U1.42 | length 3.6
  Top Layer w0.156: U1.42@15.091,49.139 15.787,49.139 15.883,49.235 16.112,49.235 16.49,49.235 16.899,48.826 16.899,47.853 L10.1@17.321,47.431
NetL11_1: L11.1 U3.D3 U3.D4 U3.E3 U3.E4 | length 2.5
  Top Layer w0.156: U3.D4@2.437,35.976 3.259,35.976 L11.1@3.564,36.281
  Top Layer w0.203: U3.E3@2.037,35.576 U3.D3@2.037,35.976 U3.D4@2.437,35.976 U3.E4@2.437,35.576
NetL12_1: L12.1 U5.D3 U5.D4 U5.E3 U5.E4 | length 2.5
  Top Layer w0.203: U5.E3@0.699,28.071 U5.D3@0.699,28.471 U5.D4@1.099,28.471 ; U5.E4@1.099,28.071 U5.D4@1.099,28.471 ; L12.1@2.245,28.801 1.914,28.471 U5.D4@1.099,28.471
NetL13_1: L13.1 U6.D3 U6.D4 U6.E3 U6.E4 | length 2.5
  Top Layer w0.156: U6.E4@16.593,37.984 U6.D4@16.993,37.984 ; U6.E3@16.593,38.384 U6.D3@16.993,38.384 U6.D4@16.993,37.984 ; L13.1@17.292,36.813 16.993,37.111 U6.D4@16.993,37.984
NetL14_1: L14.1 U7.3 | length 1.6
  Top Layer w0.156: U7.3@23.686,38.641 U7.3@23.812,38.768
  Top Layer w0.305: L14.1@23.686,37.197 U7.3@23.686,38.641
NetLED1_2: LED1.2 R137.1 | length 1.7
  Top Layer w0.156: LED1.2@2.268,21.622 2.319,21.673 R137.1@3.926,21.673
NetLED2_1: LED2.1 R18.2 | length 1.4
  Top Layer w0.305: LED2.1@68.163,9.939 69.323,9.939 R18.2@69.473,9.789
NetLED2_2: LED2.2 Q1.3 | length 1.9
  Top Layer w0.305: Q1.3@66.479,10.854 67.553,10.854 LED2.2@68.163,11.463
NetQ1_1: Q1.1 R49.2 R50.2 | length 7
  Top Layer w0.114: Q1.1@63.979,11.804 64.254,11.804 65.281,12.83 67.253,12.83 67.393,12.97 R50.2@67.393,13.097 ; R50.2@67.446,13.023 68.093,13.671 69.189,13.671 69.438,13.422 R49.2@69.438,12.882 R49.2@69.438,12.812
NetR23_2: R23.2 U4.3 | length 3
  Top Layer w0.102: U4.3@8.808,34.643 8.967,34.643 9.561,34.05 10.001,34.05 v1(10.004,34.047)
  Bottom Layer w0.102: R23.2@8.691,34.669 9.313,34.047 v1(10.004,34.047)
NetR29_1: R29.1 R30.2 U8.T34 | length 3.7
  Top Layer w0.156: R29.1@32.604,24.132 32.604,24.081 R30.2@33.04,23.645 33.283,23.645 34.024,24.387 34.191,24.387 34.756,24.952 34.933,25.129 34.933,25.249 U8.T34@35.236,25.552
NetR31_2: R31.2 U8.P32
  other v1: 37.026,25.312
NetR45_2: R45.2 U8.W8
  other v1: 45.799,38.852
NetR46_2: R46.2 U8.H7 | length 1.4
  Top Layer w0.305: U8.H7@51.323,34.285 51.323,34.226 v1(51.806,33.742)
  Bottom Layer w0.156: R46.2@51.531,34.288 51.531,34.183 51.758,33.956 51.758,33.791 v1(51.806,33.742)
NetR47_2: R47.2 U8.G8
  other v1: 51.361,33.33
NetR48_2: R48.2 U8.F18
  other v1: 47.187,28.311
NetR54_1: R54.1 U8.AP12 | length 1
  Top Layer w0.156: v1(36.801,44.309) 36.801,44.249 37.075,43.976 U8.AP12@37.075,43.937
  Bottom Layer w0.156: v1(36.801,44.309) 36.801,44.25 37.112,43.939 R54.1@37.112,43.88
NetR55_1: R55.1 U8.AH16 | length 0.2
  Bottom Layer w0.156: v1(37.989,39.57) 37.989,39.45 R55.1@38.063,39.376
NetR56_1: R56.1 U8.AP7
  other v1: 39.391,46.112
NetR57_1: R57.1 U8.AG9
  other v1: 41.691,42.119
NetR58_1: R58.1 U8.AH9
  other v1: 41.364,42.505
NetR59_1: R59.1 U8.AG16 | length 1.2
  Top Layer w0.305: v1(37.989,38.609) 38.028,38.609 38.301,38.881 U8.AG16@38.454,38.881
  Bottom Layer w0.305: v1(37.989,38.609) 38.009,38.629 38.284,38.629 38.506,38.851 R59.1@38.509,38.851
NetR69_1: R69.1 U8.AM2
  other v1: 42.565,47.453
NetR70_1: R70.1 U8.AN1
  other v1: 42.537,48.59
NetR72_1: R72.1 U8.B34
  other v1: 41.707,19.12
NetR73_1: R73.1 U8.A33
  other v1: 42.589,19.122
NetR83_2: R83.2 U9.G2 | length 0.5
  Top Layer w0.156: v1(55.946,47.519) 55.998,47.571 55.998,47.942 U9.G2@56.024,47.968
NetR84_2: R84.2 U9.T2 | length 1.4
  Top Layer w0.156: v1(60.078,43.85) 60.142,43.85 U9.T2@60.161,43.832
  Bottom Layer w0.156: R84.2@59.024,43.33 59.227,43.533 59.227,43.686 59.379,43.838 60.066,43.838 v1(60.078,43.85)
NetR85_2: R85.2 U9.A5 | length 0.5
  Top Layer w0.156: U9.A5@54.964,52.423 54.979,52.408 55.486,52.408 v1(55.501,52.393)
NetR86_2: R86.2 U9.A8 | length 0.5
  Top Layer w0.156: v1(56.156,54.067) 56.186,54.096 56.637,54.096 U9.A8@56.661,54.12
NetR87_2: R87.2 U9.J4 | length 0.7
  Bottom Layer w0.156: v1(58.075,48.18) 58.105,48.18 58.539,47.746 R87.2@58.569,47.746
NetR88_2: R88.2 U9.P4 | length 1.2
  Top Layer w0.156: U9.P4@60.373,45.882 60.397,45.906 60.397,46.344 v1(60.426,46.373)
  Bottom Layer w0.142: R88.2@59.802,46.243 59.838,46.207 60.217,46.207 60.383,46.373 v1(60.426,46.373)
NetR89_2: R89.2 U9.J5 | length 0.9
  Top Layer w0.156: U9.J5@58.641,48.746 58.652,48.734 59.093,48.734 v1(59.104,48.723)
  Bottom Layer w0.156: R89.2@59.058,48.351 59.093,48.386 59.093,48.712 v1(59.104,48.723)
NetR90_2: R90.2 U9.P5 | length 1.1
  Top Layer w0.156: U9.P5@60.939,46.448 60.962,46.472 60.962,46.733 60.973,46.744 60.973,46.838 v1(61.022,46.887)
  Bottom Layer w0.156: R90.2@60.472,47.013 60.504,47.045 60.795,47.045 60.953,46.887 v1(61.022,46.887)
NetR93_2: R93.2 U10.G2 | length 0.6
  Top Layer w0.156: v1(60.986,25.198) 60.993,25.205 61.552,25.205 U10.G2@61.559,25.212
NetR94_2: R94.2 U10.T2 | length 0.5
  Top Layer w0.305: v1(56.891,21.095) 57.402,21.095 U10.T2@57.422,21.075
NetR95_2: R95.2 U10.A5 | length 0.4
  Top Layer w0.254: v1(65.907,26.642) 65.907,26.589 66.008,26.488 66.008,26.277 U10.A5@66.013,26.272
NetR96_2: R96.2 U10.A8 | length 1.7
  Top Layer w0.305: U10.A8@67.71,24.575 68.234,24.575 68.777,25.118 v1(68.777,25.55)
NetR97_2: R97.2 U10.J4 | length 1
  Top Layer w0.156: U10.J4@61.771,23.161 61.794,23.138 61.794,22.653 v1(61.818,22.629)
  Bottom Layer w0.142: R97.2@61.506,22.896 61.528,22.896 61.795,22.629 v1(61.818,22.629)
NetR98_2: R98.2 U10.P4 | length 1.5
  Bottom Layer w0.142: R98.2@58.398,21.662 58.732,21.328 58.732,21.245 59.064,20.913 59.414,20.913 v1(59.473,20.854)
NetR99_2: R99.2 U10.J5 | length 1.2
  Top Layer w0.156: U10.J5@62.336,22.595 62.357,22.575 62.357,22.065 v1(62.377,22.045)
  Bottom Layer w0.142: R99.2@61.86,21.829 62.16,21.829 v1(62.377,22.045)
NetR100_2: R100.2 U10.P5 | length 1.3
  Bottom Layer w0.142: R100.2@59.932,21.298 R100.2@59.932,21.323 ; R100.2@59.956,21.298 60.36,20.894 60.36,20.619 v1(60.038,20.297)
NetR118_2: R118.2 U11.H5 | length 0.5
  Top Layer w0.156: v1(13.959,26.039) 13.959,26.108 14.084,26.234 14.084,26.473 U11.H5@14.102,26.491
NetR122_2: R122.2 U14.2 | length 3
  Top Layer w0.156: U14.2@7.286,10.479 U14.2@7.394,10.588 7.169,10.588 6.743,10.162 6.695,10.162 6.584,10.051 6.584,9.323 R122.2@7.346,8.561
NetR123_1: R123.1 U14.4 | length 1.3
  Top Layer w0.156: U14.4@9.794,9.638 9.879,9.722 10.929,9.722 R123.1@10.992,9.785
NetR126_2: R126.2 U16.4 | length 4.7
  Top Layer w0.156: R126.2@5.797,11.406 6.559,12.168 6.559,13.786 6.897,14.124 6.897,15.024 7.118,15.246 U16.4@7.343,15.246 U16.4@7.308,15.211
NetR127_1: R127.1 U16.2 | length 1.3
  Top Layer w0.156: U16.2@9.743,14.296 10.975,14.296 R127.1@11.033,14.354
NPU_VSEL: U6.A1 U8.U32 | length 67
  Top Layer w0.102: U6.A1@18.2,39.196 18.2,39.477 18.283,39.561 v1(18.283,39.644) ; v1(35.292,26.946) 35.3,26.939 35.614,26.939 U8.U32@35.63,26.922
  Layer 4 w0.102: v1(8.982,37.248) 9.037,37.194 9.037,36.836 8.955,36.754 8.955,34.29 9.642,33.603 10.548,32.697 10.548,30.86 9.834,30.146 9.694,30.146 8.312,28.763 8.312,22.279 10.904,19.687 12.744,19.687 13.231,19.2 20.44,19.2 24.123,15.517 24.573,15.517 24.632,15.577 24.632,15.936 24.505,16.063 v1(24.505,16.469)
  Bottom Layer w0.102: v1(8.982,37.248) 9.806,37.248 9.89,37.332 10.63,37.332 10.703,37.26 12.135,37.26 12.313,37.437 12.339,37.437 13.393,38.492 13.393,39.373 13.533,39.513 15.168,39.513 15.412,39.756 17.952,39.756 18.006,39.703 18.224,39.703 v1(18.283,39.644) ; v1(24.505,16.469) 24.505,17.286 26.657,19.438 26.657,23.566 30.313,27.223 32.484,27.223 34.163,27.223 34.656,26.73 35.046,26.73 35.262,26.946 v1(35.292,26.946)
PCIE20_0_REFCLKN: BTB_3.93 U8.L33 | length 24.7
  Top Layer w0.109: v1(36.392,2.102) 36.392,2.183 36.511,2.303 36.511,3.174 36.511,3.228 36.43,3.309 36.369,3.309 36.288,3.391 36.288,3.769 36.369,3.85 36.442,3.85 36.523,3.931 36.523,4.31 36.442,4.391 36.369,4.391 36.288,4.472 36.288,4.851 36.369,4.932 36.43,4.932 36.511,5.013 36.511,5.243 36.511,9.919 35.825,10.605 35.825,21.43 37.051,22.656 37.059,22.656 37.761,23.358 37.769,23.358 37.957,23.546 37.957,23.677 U8.L33@37.994,23.714
  Bottom Layer w0.109: v1(36.392,2.102) 36.392,0.854 BTB_3.93@36.429,0.817
PCIE20_0_REFCLKP: BTB_3.92 U8.L32 | length 24.7
  Top Layer w0.109: v1(36.904,2.104) 36.904,2.185 36.784,2.304 36.784,5.243 36.784,10.032 36.098,10.718 36.098,21.317 37.244,22.463 37.244,22.471 37.869,23.096 37.877,23.096 38.417,23.636 38.417,24.138 U8.L32@38.453,24.174
  Bottom Layer w0.109: v1(36.904,2.104) 36.917,2.09 36.917,1.787 36.955,1.749 BTB_3.92@36.955,0.843
PCIE20_0_RXN: BTB_3.98 U8.N34 | length 25.1
  Top Layer w0.109: v1(33.935,2.099) 33.935,2.161 34.139,2.365 34.139,3.809 34.139,3.864 34.058,3.945 34.024,3.945 33.943,4.026 33.943,4.404 34.024,4.485 34.098,4.485 34.179,4.567 34.179,4.945 34.098,5.026 34.023,5.026 33.942,5.107 33.942,5.486 34.023,5.567 34.057,5.567 34.138,5.648 34.137,5.885 34.137,5.939 34.179,5.981 34.179,8.446 34.363,8.63 34.363,14.488 34.165,14.686 34.165,17.962 34.425,18.222 34.425,21.698 36.398,23.671 36.398,23.841 36.579,24.022 36.579,24.137 U8.N34@36.615,24.174
  Bottom Layer w0.109: BTB_3.98@33.929,0.817 33.933,0.82 33.933,2.097 v1(33.935,2.099)
PCIE20_0_RXP: BTB_3.97 U8.N33 | length 25
  Top Layer w0.109: v1(34.483,2.104) 34.441,2.146 34.441,8.338 34.625,8.522 34.625,14.596 34.426,14.795 34.426,17.854 34.686,18.114 34.686,21.59 36.402,23.306 36.659,23.563 36.659,23.732 36.911,23.985 36.911,24.418 37.075,24.581 U8.N33@37.075,24.633
  Bottom Layer w0.109: BTB_3.97@34.455,0.843 34.457,0.844 34.457,2.074 v1@34.455,2.076
PCIE20_0_TXN: BTB_3.95 U8.M33 | length 24.4
  Top Layer w0.109: v1(35.546,2.729) 35.546,2.788 35.391,2.943 35.391,3.095 35.346,3.141 35.346,3.373 35.375,3.402 35.375,5.998 35.615,6.238 35.615,21.518 36.902,22.805 36.954,22.857 36.976,22.857 37.509,23.389 37.509,24.149 U8.M33@37.534,24.174
  Bottom Layer w0.109: BTB_3.95@35.455,0.843 35.455,2.494 35.482,2.521 35.482,2.664 v1(35.546,2.729)
PCIE20_0_TXP: BTB_3.96 U8.M34 | length 24.3
  Top Layer w0.109: v1(35.004,2.633) 35.004,2.692 35.159,2.848 35.159,2.999 35.114,3.044 35.114,3.373 35.114,3.428 35.032,3.509 34.993,3.509 34.911,3.59 34.911,3.969 34.993,4.05 35.032,4.05 35.114,4.131 35.114,4.509 35.032,4.591 34.993,4.591 34.911,4.672 34.911,5.05 34.993,5.131 35.032,5.131 35.114,5.212 35.114,5.733 35.114,6.107 35.353,6.347 35.353,21.626 36.846,23.118 36.868,23.118 37.215,23.465 37.215,23.555 37.075,23.695 U8.M34@37.075,23.714
  Bottom Layer w0.109: BTB_3.96@34.955,0.843 34.955,2.585 v1(35.004,2.633)
PCIE20_1_REFCLKN: BTB_3.85 U8.H33 | length 24.1
  Top Layer w0.109: U8.H33@39.373,22.335 39.336,22.298 39.336,22.183 38.805,21.651 38.805,21.508 38.502,21.205 37.621,20.324 37.621,11.469 40.58,8.51 40.58,5.882 40.54,5.842 40.54,5.738 40.54,5.223 40.459,5.142 40.386,5.142 40.305,5.06 40.305,4.682 40.386,4.601 40.453,4.601 40.535,4.52 40.535,4.141 40.453,4.06 40.386,4.06 40.305,3.979 40.305,3.6 40.386,3.519 40.459,3.519 40.54,3.438 40.54,3.384 40.54,2.975 40.37,2.804 v1(40.37,2.729)
  Bottom Layer w0.109: v1(40.37,2.729) 40.37,2.278 40.431,2.217 BTB_3.85@40.431,0.867
PCIE20_1_REFCLKP: BTB_3.84 U8.H32 | length 24
  Top Layer w0.109: U8.H32@39.832,22.795 39.665,22.627 39.665,22.461 39.668,22.458 39.668,22.146 39.066,21.543 39.066,21.4 38.687,21.021 37.882,20.216 37.882,11.577 40.841,8.618 40.841,5.882 40.881,5.842 v1(40.881,2.735)
  Bottom Layer w0.109: v1(40.881,2.735) 40.938,2.678 40.938,2.433 40.954,2.417 40.954,2.034 40.931,2.01 BTB_3.84@40.931,0.867
PCIE20_1_RXN: BTB_3.88 U8.J34 | length 23.8
  Top Layer w0.131: U8.J34@38.454,22.335 38.454,22.307 38.587,22.174 38.587,22.065 38.361,21.84 38.361,21.75 36.979,20.369 36.979,11.232 39.466,8.746 39.466,5.159 39.466,4.998 39.381,4.914 39.37,4.914 39.286,4.83 39.286,4.436 39.37,4.351 39.381,4.351 39.466,4.267 39.466,3.873 39.381,3.789 39.37,3.789 39.286,3.704 39.286,3.31 39.37,3.226 39.381,3.226 39.466,3.142 39.466,3.076 39.466,2.636 v1(38.932,2.102)
  Bottom Layer w0.131: BTB_3.88@38.929,0.817 v1@38.929,2.095
PCIE20_1_RXP: BTB_3.87 U8.J33 | length 23.7
  Top Layer w0.131: U8.J33@38.913,22.794 38.913,22.749 38.819,22.655 38.819,21.969 38.593,21.743 38.593,21.654 38.323,21.384 37.212,20.272 37.212,11.328 39.698,8.842 39.698,5.159 39.698,2.394 39.483,2.179 v1(39.483,2.104)
  Bottom Layer w0.131: BTB_3.87@39.455,0.843 v1@39.455,2.076
PCIE20_1_TXN: BTB_3.90 U8.K34 | length 24.1
  Top Layer w0.131: v1(37.921,2.716) 37.975,2.769 37.975,3.101 38.048,3.175 38.048,6.833 38.048,6.898 37.964,6.983 37.888,6.983 37.803,7.067 37.803,7.461 37.888,7.545 37.987,7.545 38.071,7.63 38.071,8.024 37.987,8.108 37.888,8.108 37.803,8.192 37.803,8.586 37.888,8.671 37.964,8.671 38.048,8.755 38.048,8.977 38.048,9.203 36.32,10.931 36.32,21.195 37.735,22.611 37.764,22.611 37.948,22.795 U8.K34@37.994,22.795
  Bottom Layer w0.131: BTB_3.90@37.931,0.843 37.931,2.217 37.941,2.228 37.941,2.668 v1@37.955,2.682
PCIE20_1_TXP: BTB_3.89 U8.K33 | length 24.1
  Top Layer w0.131: v1(38.452,2.731) 38.452,2.802 38.303,2.95 38.303,9.082 38.303,9.235 38.281,9.257 38.281,9.299 36.552,11.028 36.552,21.091 37.584,22.123 37.834,22.372 38.006,22.372 38.454,22.82 U8.K33@38.454,23.254
  Bottom Layer w0.131: BTB_3.89@38.431,0.867 38.431,2.01 38.441,2.02 38.441,2.72 v1(38.452,2.731)